# Altium PCB Briac_Charger.PcbDoc (part 2 of 4)
Units mm, origin at the board's own origin, x right, y up, seen from the top; angles counter-clockwise.
Board outline 70.05 x 79.98 mm, 2 copper layers (Top Layer, Bottom Layer), stack 1.448 mm thick; 114 components, 62 nets, 335 pads, 3733 vias.
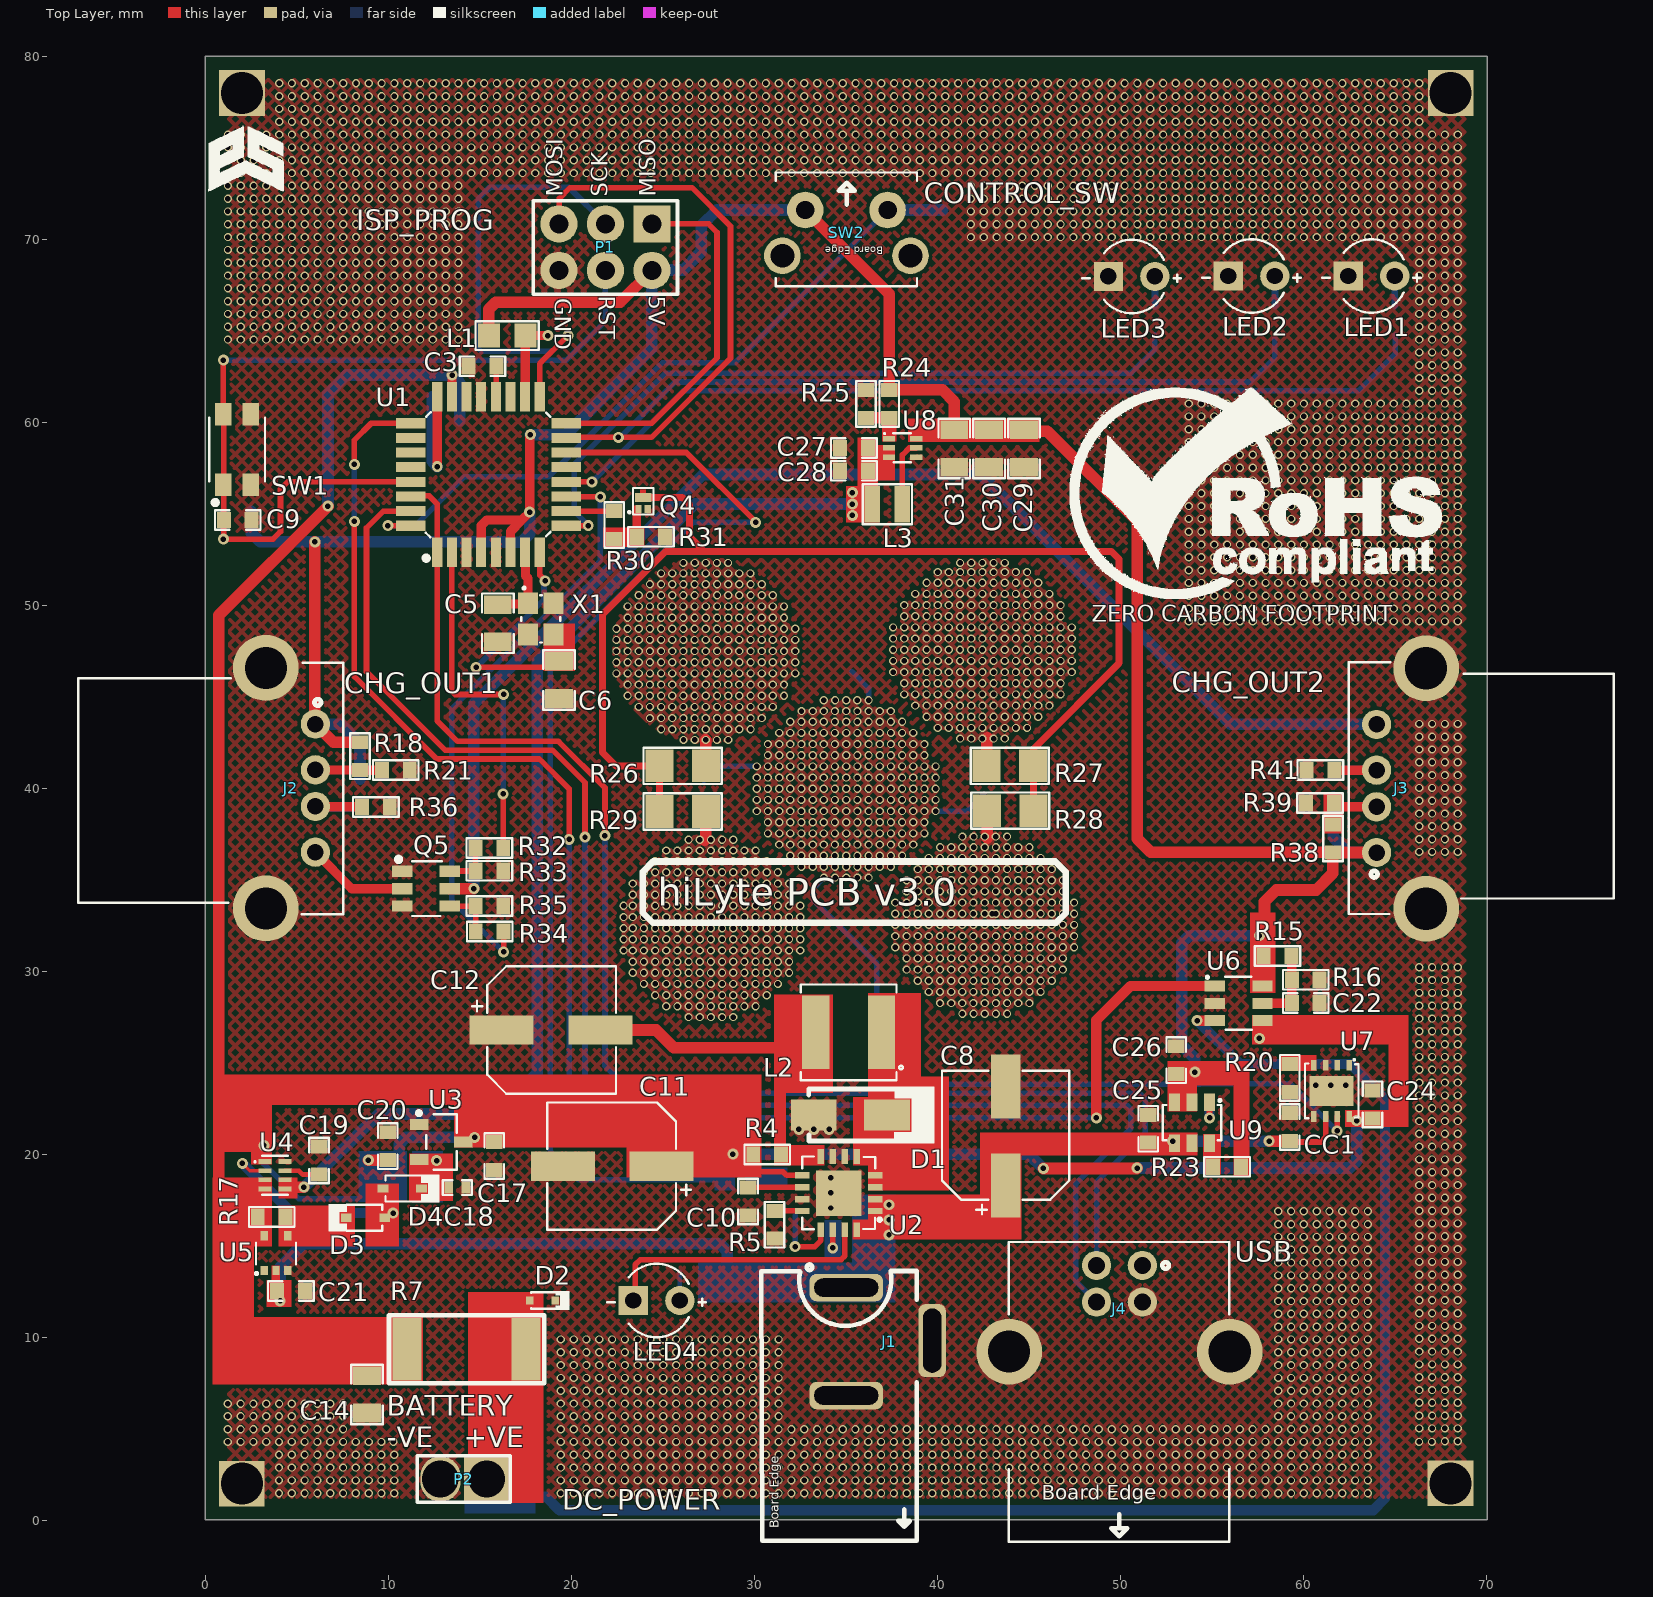
[diagram p0: Top Layer view]

## Part data (continued)
R9: library part AC0603FR-0733KL, "Res Thick Film 0603 33K Ohm 1% 1/10W ±100ppm/°C Molded SMD Paper T/R", Case Code (Imperial)=0603, Case Code (Metric)=1608, MANUFACTURER=Yageo, Max Operating Temperature=155°C, Max Power Dissipation=100mW, Min Operating Temperature=-55°C, Resistance=33kR, Resistor Type="Thick Film", Supplier Part Number 1=YAG3598CT-ND, Temperature Coefficient=100ppm/°C, Tolerance=1%, Voltage Rating=50V, Case/Package=0603, Category="Chip SMD Resistors", ComponentLink1Description=http://components.arrow.com/part/dataview/0323_03349868?src-supplier=Arrow+Europe, ComponentLink1URL=http://components.arrow.com/part/dataview/0323_03349868?src-supplier=Arrow+Europe, ComponentLink2Description=http://www.yageo.com/NewPortal/yageodocoutput?fileName=/pdf/R-Chip/PYu-AC_51_RoHS_L_6.pdf&src-supplier=Arrow+Electronics, ComponentLink2URL=http://www.yageo.com/NewPortal/yageodocoutput?fileName=/pdf/R-Chip/PYu-AC_51_RoHS_L_6.pdf&src-supplier=Arrow+Electronics, ComponentLink3Description=http://www.yageo.com/NewPortal/yageodocoutput?fileName=/pdf/R-Chip/PYu-AC_51_RoHS_L_6.pdf&src-supplier=Digi-Key, ComponentLink3URL=http://www.yageo.com/NewPortal/yageodocoutput?fileName=/pdf/R-Chip/PYu-AC_51_RoHS_L_6.pdf&src-supplier=Digi-Key, ComponentLink4Description=http://www.yageo.com/documents/recent/PYu-AC_51_RoHS_L_2.pdf?src-supplier=Future+Electronics, ComponentLink4URL=http://www.yageo.com/documents/recent/PYu-AC_51_RoHS_L_2.pdf?src-supplier=Future+Electronics, ComponentLink5Description=http://www.yageo.com/NewPortal/yageodocoutput?fileName=/pdf/R-Chip/PYu-AC_51_RoHS_L_6.pdf&src-supplier=Mouser, ComponentLink5URL=http://www.yageo.com/NewPortal/yageodocoutput?fileName=/pdf/R-Chip/PYu-AC_51_RoHS_L_6.pdf&src-supplier=Mouser, ComponentLink6Description=http://www.yageo.com/NewPortal/yageodocoutput?fileName=/pdf/R-Chip/PYu-AC_51_RoHS_L_6.pdf&src-supplier=Rutronik, ComponentLink6URL=http://www.yageo.com/NewPortal/yageodocoutput?fileName=/pdf/R-Chip/PYu-AC_51_RoHS_L_6.pdf&src-supplier=Rutronik, ComponentLink7Description=http://www.yageo.com/NewPortal/yageodocoutput?fileName=/pdf/R-Chip/PYu-AC_51_RoHS_L_6.pdf&src-supplier=Schukat, ComponentLink7URL=http://www.yageo.com/NewPortal/yageodocoutput?fileName=/pdf/R-Chip/PYu-AC_51_RoHS_L_6.pdf&src-supplier=Schukat, ComponentLink8Description=http://www.yageo.com/NewPortal/yageodocoutput?fileName=/pdf/R-Chip/PYu-AC_51_RoHS_L_6.pdf&src-supplier=TTI, ComponentLink8URL=http://www.yageo.com/NewPortal/yageodocoutput?fileName=/pdf/R-Chip/PYu-AC_51_RoHS_L_6.pdf&src-supplier=TTI, Construction=Rectangular, Depth=0.8mm, Features="Moisture Resistant,Automotive AEC-Q200", Height=0.022inch, Lead Free="Lead Free", Length=1.6mm, Manufacturer Part Number=AC0603FR-0733KL, Military Standard=Not, Number of Terminations=2, Packaging="Tape and Reel", Power Rating=100mW, Pricing 1="1=0.10000, 10=0.02900, 100=0.01170, 1000=0.00527, 2500=0.00458 (USD)", RoHS=Yes, RoHS Compliant=Yes, Series=AC, Stock 1=9255, Supplier 1=Digi-Key, Termination=SMD/SMT, Width=0.031inch
R11 R12 R13: library part RC0603FR-073K3L, "RES SMD 3.3K OHM 1% 1/10W 0603", Case/Package=0603, MANUFACTURER="Yageo Phycomp", Max Operating Temperature=155°C, Min Operating Temperature=-55°C, Power Rating=100mW, Resistance=3.3kR, Supplier Part Number 1=311-3.30KHRCT-ND, Temperature Coefficient=100ppm/°C, Tolerance=1%, Voltage Rating (DC)=50V, Depth=0.8mm, Height=0.45mm, Lead Free="Lead Free", Length=1.6mm, Manufacturer Part Number=RC0603FR-073K3L, Mount="Surface Mount", Number of Pins=2, Packaging="Cut Tape", Pricing 1="1=0.1, 10=0.024, 100=0.0097, 1000=0.00437, 2500=0.00379 (USD)", REACH SVHC="No SVHC", Stock 1=6863000, Supplier 1=Digi-Key, Width=800um
R14: library part RC0603JR-07470KL, "RES 470K OHM 5% 1/10W 0603", Case Code (Imperial)=0603, Case Code (Metric)=1608, MANUFACTURER=Yageo, Max Operating Temperature=155°C, Max Power Dissipation=100mW, Min Operating Temperature=-55°C, Package Quantity=1, Resistance=470kR, Resistance Tolerance=5%, Resistor Type="Thick Film", Supplier Part Number 1=311-470KGRCT-ND, Temperature Coefficient=100ppm/°C, Voltage Rating=75V, Voltage Rating (DC)=50V, Case/Package=0603, ComponentLink1Description=https://datasheet.ciiva.com/2452/pyu-r-int-thick-7-2452918.pdf?src-supplier=Digi-Key, ComponentLink1URL=https://datasheet.ciiva.com/2452/pyu-r-int-thick-7-2452918.pdf?src-supplier=Digi-Key, ComponentLink2Description=https://datasheet.ciiva.com/2452/pyu-r-int-thick-7-2452919.pdf?src-supplier=Digi-Key, ComponentLink2URL=https://datasheet.ciiva.com/2452/pyu-r-int-thick-7-2452919.pdf?src-supplier=Digi-Key, ComponentLink3Description=https://datasheet.ciiva.com/7746/443971-7746489.pdf?src-supplier=Element14, ComponentLink3URL=https://datasheet.ciiva.com/7746/443971-7746489.pdf?src-supplier=Element14, ComponentLink4Description=https://datasheet.ciiva.com/7746/443971-7746490.pdf?src-supplier=Element14, ComponentLink4URL=https://datasheet.ciiva.com/7746/443971-7746490.pdf?src-supplier=Element14, ComponentLink5Description=https://datasheet.ciiva.com/46395/443971-46395146.pdf?src-supplier=Element14, ComponentLink5URL=https://datasheet.ciiva.com/46395/443971-46395146.pdf?src-supplier=Element14, ComponentLink6Description=https://datasheet.ciiva.com/15189/getdatasheetpartid-343810-15189869.pdf?src-supplier=Verical, ComponentLink6URL=https://datasheet.ciiva.com/15189/getdatasheetpartid-343810-15189869.pdf?src-supplier=Verical, ComponentLink7Description=http://www.yageo.com/documents/recent/PYu-RC_Group_51_RoHS_L_10.pdf?src-supplier=Digi-Key, ComponentLink7URL=http://www.yageo.com/documents/recent/PYu-RC_Group_51_RoHS_L_10.pdf?src-supplier=Digi-Key, ComponentLink8Description=http://www.yageo.com/documents/recent/PYu-RC_Group_51_RoHS_L_9.pdf?src-supplier=Digi-Key, ComponentLink8URL=http://www.yageo.com/documents/recent/PYu-RC_Group_51_RoHS_L_9.pdf?src-supplier=Digi-Key, ComponentLink9Description=http://www.farnell.com/datasheets/1868787.pdf?src-supplier=Element14, ComponentLink9URL=http://www.farnell.com/datasheets/1868787.pdf?src-supplier=Element14, Construction=Rectangular, Depth=0.8mm, Features="Moisture Resistant", Height=0.022inch, Lead Free="Lead Free", Length=1.6mm, Manufacturer Part Number=RC0603JR-07470KL, Military Standard=Not, Number of Pins=2, Number of Terminations=2, Packaging="Tape and Reel", Power Rating=100mW, Pricing 1="1=0.1, 10=0.02, 100=0.008, 1000=0.0036, 2500=0.0031 (USD)", REACH SVHC="No SVHC", RoHS Compliant=Yes, Series=RC, Size Code=0603, Stock 1=1213798, Supplier 1=Digi-Key, Termination=SMD/SMT, Tolerance=5%, Weight=7.1E-05oz, Width=0.8mm
R18 R21 R22 R36 R38 R39 R40 R41: library part ERJP03F4702V, "RES SMD 47K Ohm 1% 0.2W(1/5W) 0603", Case Code (Imperial)=0603, Case Code (Metric)=1608, MANUFACTURER=Panasonic, Manufacturer Part Number=ERJ-P03F4702V, Max Operating Temperature=155°C, Min Operating Temperature=-55°C, Package Quantity=5000, Power Rating=200mW, Resistance=47kR, Resistor Type="Thick Film", Supplier Part Number 1=P16027CT-ND, Temperature Coefficient=200ppm/°C, Tolerance=1%, Voltage Rating=150V, Case/Package=0603, Category="Chip SMD Resistors", ComponentLink1Description=https://datasheet.ciiva.com/11817/0900766b812cb812-11817157.pdf?src-supplier=RSComponents, ComponentLink1URL=https://datasheet.ciiva.com/11817/0900766b812cb812-11817157.pdf?src-supplier=RSComponents, ComponentLink2Description=https://datasheet.ciiva.com/48537/erjp-series-eng-tds-48537294.pdf?src-supplier=Distrelec, ComponentLink2URL=https://datasheet.ciiva.com/48537/erjp-series-eng-tds-48537294.pdf?src-supplier=Distrelec, ComponentLink3Description=https://datasheet.ciiva.com/6138/1801181-6138332.pdf?src-supplier=Farnell, ComponentLink3URL=https://datasheet.ciiva.com/6138/1801181-6138332.pdf?src-supplier=Farnell, ComponentLink4Description=https://datasheet.ciiva.com/7802/1790600-7802523.pdf?src-supplier=Element14, ComponentLink4URL=https://datasheet.ciiva.com/7802/1790600-7802523.pdf?src-supplier=Element14, ComponentLink5Description=https://datasheet.ciiva.com/7802/1790600-7802522.pdf?src-supplier=Element14, ComponentLink5URL=https://datasheet.ciiva.com/7802/1790600-7802522.pdf?src-supplier=Element14, ComponentLink6Description=https://datasheet.ciiva.com/22730/1790600-22730106.pdf?src-supplier=Element14, ComponentLink6URL=https://datasheet.ciiva.com/22730/1790600-22730106.pdf?src-supplier=Element14, ComponentLink7Description=https://datasheet.ciiva.com/28681/1790600-28681575.pdf?src-supplier=Element14, ComponentLink7URL=https://datasheet.ciiva.com/28681/1790600-28681575.pdf?src-supplier=Element14, ComponentLink8Description=https://datasheet.ciiva.com/24072/aoa0000ce4-64075-24072175.pdf?src-supplier=Mouser, ComponentLink8URL=https://datasheet.ciiva.com/24072/aoa0000ce4-64075-24072175.pdf?src-supplier=Mouser, Contact Plating=Tin, Depth=0.8mm, Height=0.45mm, Length=1.6mm, Military Standard=Not, Mount="Surface Mount", Number of Pins=2, Packaging="Tape and Reel", Pricing 1="1=0.37000, 10=0.31600, 100=0.12360, 1000=0.05175, 2500=0.04744 (USD)", Radiation Hardening=No, REACH SVHC="No SVHC", RoHS=Yes, RoHS Compliant=Yes, Stock 1=5635, Supplier 1=Digi-Key, Termination=SMD/SMT, Voltage Rating (DC)=150V, Width=0.8mm
R20: library part ERJU3RD3300V, "RES SMD 0.5% 100mW 33kO 0603", MANUFACTURER=PANASONIC, Operating Temperature Range=-55?~+155?, Power(Watts)=100mW, Temperature Coefficient=±50ppm/?, Tolerance=±0.5%
R24: library part AC0603FR-07732KL, "RES SMD 732kOhm 1% 0603", Case Code (Imperial)=0603, Case Code (Metric)=1608, MANUFACTURER=Yageo, Max Operating Temperature=155°C, Max Power Dissipation=100mW, Min Operating Temperature=-55°C, Resistance=732kR, Resistor Type="Thick Film", Supplier Part Number 1=603-AC0603FR-07732KL, Temperature Coefficient=100ppm/°C, Tolerance=1%, Voltage Rating=50V, Case/Package=0603, Category="Chip SMD Resistors", ComponentLink1Description=http://www.mouser.com/ds/2/447/yageodocoutput-1111992.pdf?src-supplier=Mouser, ComponentLink1URL=http://www.mouser.com/ds/2/447/yageodocoutput-1111992.pdf?src-supplier=Mouser, ComponentLink2Description=http://www.yageo.com/NewPortal/yageodocoutput?fileName=/pdf/R-Chip/PYu-AC_51_RoHS_L_6.pdf&src-supplier=Digi-Key, ComponentLink2URL=http://www.yageo.com/NewPortal/yageodocoutput?fileName=/pdf/R-Chip/PYu-AC_51_RoHS_L_6.pdf&src-supplier=Digi-Key, Features="Moisture Resistant,Automotive AEC-Q200", Height=0.022inch, Length=0.063inch, Manufacturer Part Number=AC0603FR-07732KL, Number of Terminations=2, Packaging="Tape and Reel", Power Rating=100mW, Pricing 1="1=0.10000, 10=0.02200, 50=0.02200, 100=0.00800, 1000=0.00600, 10000=0.00400 (USD)", RoHS=Yes, RoHS Compliant=Yes, Series=AC, Stock 1=40000, Supplier 1=Mouser, Termination=SMD/SMT, Width=0.031inch
R26 R27 R28 R29: library part ERJ8BWFR100V, "RES SMD 1206 0.1 Ohm 1% 1W ±100ppm/°C", Case Code (Imperial)=1206, Case Code (Metric)=3216, MANUFACTURER=Panasonic, Manufacturer Part Number=ERJ-8BWFR100V, Max Operating Temperature=155°C, Max Power Dissipation=1W, Min Operating Temperature=-55°C, Package Quantity=1, Resistance=100mR, Resistance Tolerance=1%, Resistor Type="Thick Film,Low-Ohm-Resistor", Supplier Part Number 1=P.10AUCT-ND, Temperature Coefficient=100ppm/°C, Case/Package=1206, Category="Chip SMD Resistors", ComponentLink1Description=https://datasheet.ciiva.com/11812/0900766b8126441d-11812516.pdf?src-supplier=RSComponents, ComponentLink1URL=https://datasheet.ciiva.com/11812/0900766b8126441d-11812516.pdf?src-supplier=RSComponents, ComponentLink2Description=https://datasheet.ciiva.com/16212/erj-8bwfr100v-16212037.pdf?src-supplier=Future+Electronics, ComponentLink2URL=https://datasheet.ciiva.com/16212/erj-8bwfr100v-16212037.pdf?src-supplier=Future+Electronics, ComponentLink3Description=https://datasheet.ciiva.com/24072/aoa0000ce3-72189-24072813.pdf?src-supplier=Mouser, ComponentLink3URL=https://datasheet.ciiva.com/24072/aoa0000ce3-72189-24072813.pdf?src-supplier=Mouser, ComponentLink4Description=https://datasheet.ciiva.com/2451/aoa0000ce3-2451533.pdf?src-supplier=Digi-Key, ComponentLink4URL=https://datasheet.ciiva.com/2451/aoa0000ce3-2451533.pdf?src-supplier=Digi-Key, ComponentLink5Description=https://datasheet.ciiva.com/17208/aoa0000ce3-17208060.pdf?src-supplier=Avnet+Europe, ComponentLink5URL=https://datasheet.ciiva.com/17208/aoa0000ce3-17208060.pdf?src-supplier=Avnet+Europe, ComponentLink6Description=https://datasheet.ciiva.com/2451/aoa0000ce3-2451532.pdf?src-supplier=Digi-Key, ComponentLink6URL=https://datasheet.ciiva.com/2451/aoa0000ce3-2451532.pdf?src-supplier=Digi-Key, ComponentLink7Description=https://datasheet.ciiva.com/46386/1662788-46386715.pdf?src-supplier=Element14, ComponentLink7URL=https://datasheet.ciiva.com/46386/1662788-46386715.pdf?src-supplier=Element14, ComponentLink8Description=https://datasheet.ciiva.com/6137/1662788-6137674.pdf?src-supplier=Farnell, ComponentLink8URL=https://datasheet.ciiva.com/6137/1662788-6137674.pdf?src-supplier=Farnell, ComponentLink9Description=https://datasheet.ciiva.com/43455/1662788-43455193.pdf?src-supplier=Farnell, ComponentLink9URL=https://datasheet.ciiva.com/43455/1662788-43455193.pdf?src-supplier=Farnell, ComponentLink10Description=https://datasheet.ciiva.com/16787/70068852-16787433.pdf?src-supplier=Allied+Electronics, ComponentLink10URL=https://datasheet.ciiva.com/16787/70068852-16787433.pdf?src-supplier=Allied+Electronics, ComponentLink11Description=https://datasheet.ciiva.com/28667/39793-28667735.pdf?src-supplier=Element14, ComponentLink11URL=https://datasheet.ciiva.com/28667/39793-28667735.pdf?src-supplier=Element14, ComponentLink12Description=https://datasheet.ciiva.com/48516/erj-eng-tds-48516677.pdf?src-supplier=Distrelec, ComponentLink12URL=https://datasheet.ciiva.com/48516/erj-eng-tds-48516677.pdf?src-supplier=Distrelec, ComponentLink13Description=https://datasheet.ciiva.com/30092/6aoa0000ce3-30092213.pdf?src-supplier=Onlinecomponents.com, ComponentLink13URL=https://datasheet.ciiva.com/30092/6aoa0000ce3-30092213.pdf?src-supplier=Onlinecomponents.com, ComponentLink14Description=https://datasheet.ciiva.com/16783/70068852-16783653.pdf?src-supplier=Allied+Electronics, ComponentLink14URL=https://datasheet.ciiva.com/16783/70068852-16783653.pdf?src-supplier=Allied+Electronics, ComponentLink15Description=https://datasheet.ciiva.com/16780/70068852-16780101.pdf?src-supplier=Allied+Electronics, ComponentLink15URL=https://datasheet.ciiva.com/16780/70068852-16780101.pdf?src-supplier=Allied+Electronics, ComponentLink16Description=https://datasheet.ciiva.com/2451/aoa0000ce3-2451534.pdf?src-supplier=Digi-Key, ComponentLink16URL=https://datasheet.ciiva.com/2451/aoa0000ce3-2451534.pdf?src-supplier=Digi-Key, ComponentLink17Description=https://datasheet.ciiva.com/16516/aoa0000ce3-16516495.pdf?src-supplier=Avnet+Asia, ComponentLink17URL=https://datasheet.ciiva.com/16516/aoa0000ce3-16516495.pdf?src-supplier=Avnet+Asia, Construction=Rectangular, Contact Plating=Tin, Depth=1.6mm, Features="Automotive AEC-Q200", Height=0.65mm, Lead Free="Lead Free", Length=3.2mm, Military Standard=Not, Mount="Surface Mount", Number of Pins=2, Number of Terminations=2, Packaging="Tape and Reel", Power Rating=1W, Pricing 1="1=0.86000, 10=0.63400, 100=0.36940, 1000=0.20719, 2500=0.20002 (USD)", Radiation Hardening=No, REACH SVHC="No SVHC", RoHS=Yes, RoHS Compliant=Yes, Series=ERJ, Size Code=1206, Stock 1=71395, Supplier 1=Digi-Key, Technology="THICK FILM", Termination=SMD/SMT, Tolerance=1%, Width=0.063inch
SW1: "3mm 2mm Round Button 50mA Top3.65mm SPST 12V SMD Tactile Switches", MANUFACTURER=XKB, Package=Custom, ComponentLink1Description=LCSC, ComponentLink1URL=https://lcsc.com/product-detail/Tactile-Switches_XKB-Connectivity-TS-1185EC-C-D-B_C318893.html, Manufacturer Part No=TS-1185EC-C-D-B
SW2: "6mm 8.35mm Round Button 50mA 6mm SPST 12V Plugin Tactile Switches", MANUFACTURER=ALPSALPINE, Package=Custom, ComponentLink1Description=LCSC, ComponentLink1URL=https://lcsc.com/product-detail/Tactile-Switches_ALPSALPINE-SKHHLQA010_C125034.html, Manufacturer Part No=SKHHLQA010
U1: "IC MCU 8BIT 32KB FLASH 32TQFP", Case/Package=A, Frequency=20MHz, MANUFACTURER="Microchip / Atmel", Max Operating Temperature=85°C, Max Supply Voltage=5.5V, Min Operating Temperature=-40°C, Min Supply Voltage=1.8V, Package Quantity=250, Supplier Part Number 1=25AC6140, Category=Microcontrollers, ComponentLink1Description=https://datasheet.ciiva.com/1166/doc8161-1166860.pdf?src-supplier=Newark, ComponentLink1URL=https://datasheet.ciiva.com/1166/doc8161-1166860.pdf?src-supplier=Newark, ComponentLink2Description=https://datasheet.ciiva.com/29119/155196-da-01-en-microcontr-atmega328p-au-8bit-tqfp-32-29119594.pdf?src-supplier=Conrad, ComponentLink2URL=https://datasheet.ciiva.com/29119/155196-da-01-en-microcontr-atmega328p-au-8bit-tqfp-32-29119594.pdf?src-supplier=Conrad, ComponentLink3Description=https://datasheet.ciiva.com/1157/1693866-1157693.pdf?src-supplier=Element14, ComponentLink3URL=https://datasheet.ciiva.com/1157/1693866-1157693.pdf?src-supplier=Element14, ComponentLink4Description=https://datasheet.ciiva.com/15213/getdatasheetpartid-365828-15213131.pdf?src-supplier=Verical, ComponentLink4URL=https://datasheet.ciiva.com/15213/getdatasheetpartid-365828-15213131.pdf?src-supplier=Verical, Core Architecture=AVR, Data Bus Width=8b, Height=1mm, Interface=I2C,SPI,USART, Lead Free="Lead Free", Length=7mm, Manufacturer Part Number=ATMEGA328P-AU, Max Frequency=20MHz, Memory Size=32KB, Memory Type=FLASH, Mount="Surface Mount", Number of ADC Channels=8, Number of I2C Channels=1, Number of I/Os=23, Number of Pins=32, Number of Programmable I/O=23, Number of PWM Channels=6, Number of SPI Channels=1, Number of Timers/Counters=3, Oscillator Type=Internal, Packaging=Tray, Peripherals="Brown-out Detect/Reset,POR,PWM,WDT", Radiation Hardening=No, RAM Size=2KB, REACH SVHC="No SVHC", RoHS=Yes, RoHS Compliant=Yes, Series=ATmega328P, Supplier 1=Newark, Watchdog Timer=Yes, Weight=0.002469oz, Width=7mm
U2: "QFN-16_4x4x065P Battery Management ICs ROHS", MANUFACTURER=TOPPOWER, Package="16 QFN 4x4", ComponentLink1Description=LCSC, ComponentLink1URL=https://lcsc.com/product-detail/Battery-Management-ICs_TOPPOWER-Nanjing-Extension-Microelectronics-TP5000-QFN16_C51699.html, Manufacturer Part No=TP5000_QFN16
U3: "IC DETECTOR VOLT 2.9V OD SSOP3", Case/Package=SSOP, MANUFACTURER=Rohm, Max Operating Temperature=105°C, Max Reset Threshold Voltage=2.929V, Max Supply Voltage=6V, Min Operating Temperature=-40°C, Min Reset Threshold Voltage=2.871V, Min Supply Voltage=2.3V, Number of Voltages Monitored=1, Operating Supply Current=900nA, Supplier Part Number 1=755-BD48K29G-TL, Threshold Voltage=2.9V, Accuracy=1%, Category="Voltage Supervisors", ComponentLink1Description=https://datasheet.ciiva.com/15105/getdatasheetpartid-705726-15105774.pdf?src-supplier=Verical, ComponentLink1URL=https://datasheet.ciiva.com/15105/getdatasheetpartid-705726-15105774.pdf?src-supplier=Verical, ComponentLink2Description=https://datasheet.ciiva.com/6598/bd48xxg-e-6598662.pdf?src-supplier=Digi-Key, ComponentLink2URL=https://datasheet.ciiva.com/6598/bd48xxg-e-6598662.pdf?src-supplier=Digi-Key, Lead Free="Lead Free", Manufacturer Part Number=BD48K29G-TL, Mount="Surface Mount", Number of Monitored Inputs=1, Number of Pins=3, Package Quantity=1, Packaging="Tape and Reel", Pricing 1="1=0.48000, 10=0.39100, 50=0.39100, 100=0.24100, 500=0.20000, 1000=0.15000, 3000=0.13600, 10000=0.13600 (USD)", Radiation Hardening=No, Reset="Active Low", RoHS=Yes, RoHS Compliant=Yes, Series=BD48xxx, Stock 1=2854, Supplier 1=Mouser, Type="Simple Reset/Power-On Reset,Voltage Detector"
U4: "IC PWR SWITCH N-CHAN 1:1 8TDFN", MANUFACTURER="Dialog Semiconductor", Max Operating Temperature=70°C, Max Output Current=4A, Min Operating Temperature=-20°C, Supplier Part Number 1=1827-1124-1-ND, ComponentLink1Description=https://datasheet.ciiva.com/3231/lmr62014-3231410.pdf?src-supplier=Avnet, ComponentLink1URL=https://datasheet.ciiva.com/3231/lmr62014-3231410.pdf?src-supplier=Avnet, ComponentLink2Description=https://datasheet.ciiva.com/23854/1777788-23854326.pdf?src-supplier=Newark, ComponentLink2URL=https://datasheet.ciiva.com/23854/1777788-23854326.pdf?src-supplier=Newark, ComponentLink3Description=https://datasheet.ciiva.com/4879/snvs735a-74121-4879731.pdf?src-supplier=Mouser, ComponentLink3URL=https://datasheet.ciiva.com/4879/snvs735a-74121-4879731.pdf?src-supplier=Mouser, ComponentLink4Description=https://datasheet.ciiva.com/22669/1716576-22669414.pdf?src-supplier=Element14, ComponentLink4URL=https://datasheet.ciiva.com/22669/1716576-22669414.pdf?src-supplier=Element14, ComponentLink5Description=https://datasheet.ciiva.com/6603/lmr62014-6603804.pdf?src-supplier=Digi-Key, ComponentLink5URL=https://datasheet.ciiva.com/6603/lmr62014-6603804.pdf?src-supplier=Digi-Key, ComponentLink6Description=https://datasheet.ciiva.com/6603/lmr62014-6603807.pdf?src-supplier=Digi-Key, ComponentLink6URL=https://datasheet.ciiva.com/6603/lmr62014-6603807.pdf?src-supplier=Digi-Key, ComponentLink7Description=https://www.verical.com/server-webapp/html/getDatasheet?partID=705722&src-supplier=Verical, ComponentLink7URL=https://www.verical.com/server-webapp/html/getDatasheet?partID=705722&src-supplier=Verical, ComponentLink8Description=http://rohmfs.rohm.com/en/techdata_basic/ic/package/ssop3_1-e.pdf?src-supplier=Digi-Key, ComponentLink8URL=http://rohmfs.rohm.com/en/techdata_basic/ic/package/ssop3_1-e.pdf?src-supplier=Digi-Key, ComponentLink9Description=http://rohmfs.rohm.com/en/products/databook/datasheet/ic/power/voltage_detector/bd48xxg-e.pdf?src-supplier=Digi-Key, ComponentLink9URL=http://rohmfs.rohm.com/en/products/databook/datasheet/ic/power/voltage_detector/bd48xxg-e.pdf?src-supplier=Digi-Key, Manufacturer Part Number=SLG7NT402V, Number of Outputs=1, Number of Pins=8, Output Configuration="High Side", Packaging="Cut Tape", Pricing 1="1=0.67, 10=0.591, 25=0.5548, 100=0.4529, 250=0.4206, 500=0.358, 1000=0.2864 (USD)", Stock 1=74575, Supplier 1=Digi-Key
U5: "IC INVERTER OD 1CH 1-INP SC70-5", Case/Package=SC, Low Level Output Current=32mA, MANUFACTURER="ON Semiconductor / Fairchild", Max Operating Temperature=85°C, Max Supply Voltage=5.5V, Min Operating Temperature=-40°C, Min Supply Voltage=1.65V, Package Quantity=1, Quiescent Current=2uA, Supplier Part Number 1=NC7SZ05P5XCT-ND, Category="Amplifiers - Op Amps, Buffer, Instrumentation", ComponentLink1Description=https://datasheet.ciiva.com/3231/lmr62014-3231410.pdf?src-supplier=Avnet, ComponentLink1URL=https://datasheet.ciiva.com/3231/lmr62014-3231410.pdf?src-supplier=Avnet, ComponentLink2Description=https://datasheet.ciiva.com/23854/1777788-23854326.pdf?src-supplier=Newark, ComponentLink2URL=https://datasheet.ciiva.com/23854/1777788-23854326.pdf?src-supplier=Newark, ComponentLink3Description=https://datasheet.ciiva.com/4879/snvs735a-74121-4879731.pdf?src-supplier=Mouser, ComponentLink3URL=https://datasheet.ciiva.com/4879/snvs735a-74121-4879731.pdf?src-supplier=Mouser, ComponentLink4Description=https://datasheet.ciiva.com/22669/1716576-22669414.pdf?src-supplier=Element14, ComponentLink4URL=https://datasheet.ciiva.com/22669/1716576-22669414.pdf?src-supplier=Element14, ComponentLink5Description=https://datasheet.ciiva.com/6603/lmr62014-6603804.pdf?src-supplier=Digi-Key, ComponentLink5URL=https://datasheet.ciiva.com/6603/lmr62014-6603804.pdf?src-supplier=Digi-Key, ComponentLink6Description=https://datasheet.ciiva.com/6603/lmr62014-6603807.pdf?src-supplier=Digi-Key, ComponentLink6URL=https://datasheet.ciiva.com/6603/lmr62014-6603807.pdf?src-supplier=Digi-Key, ComponentLink7Description=https://datasheet.ciiva.com/5701/678459-5701517.pdf?src-supplier=Farnell, ComponentLink7URL=https://datasheet.ciiva.com/5701/678459-5701517.pdf?src-supplier=Farnell, ComponentLink8Description=https://datasheet.ciiva.com/26097/nc7sz05-26097353.pdf?src-supplier=Avnet+Europe, ComponentLink8URL=https://datasheet.ciiva.com/26097/nc7sz05-26097353.pdf?src-supplier=Avnet+Europe, ComponentLink9Description=https://datasheet.ciiva.com/46415/678459-46415099.pdf?src-supplier=Element14, ComponentLink9URL=https://datasheet.ciiva.com/46415/678459-46415099.pdf?src-supplier=Element14, ComponentLink10Description=https://datasheet.ciiva.com/16783/nc7sz05-16783085.pdf?src-supplier=Future+Electronics, ComponentLink10URL=https://datasheet.ciiva.com/16783/nc7sz05-16783085.pdf?src-supplier=Future+Electronics, ComponentLink11Description=https://datasheet.ciiva.com/1861/nc7sz05-1861934.pdf?src-supplier=Digi-Key, ComponentLink11URL=https://datasheet.ciiva.com/1861/nc7sz05-1861934.pdf?src-supplier=Digi-Key, ComponentLink12Description=https://datasheet.ciiva.com/7970/678459-7970639.pdf?src-supplier=Element14, ComponentLink12URL=https://datasheet.ciiva.com/7970/678459-7970639.pdf?src-supplier=Element14, ComponentLink13Description=https://datasheet.ciiva.com/1861/nc7sz05-1861932.pdf?src-supplier=Digi-Key, ComponentLink13URL=https://datasheet.ciiva.com/1861/nc7sz05-1861932.pdf?src-supplier=Digi-Key, ComponentLink14Description=https://datasheet.ciiva.com/5701/nc7sz05-5701516.pdf?src-supplier=Farnell, ComponentLink14URL=https://datasheet.ciiva.com/5701/nc7sz05-5701516.pdf?src-supplier=Farnell, ComponentLink15Description=https://datasheet.ciiva.com/1861/nc7sz05-1861933.pdf?src-supplier=Digi-Key, ComponentLink15URL=https://datasheet.ciiva.com/1861/nc7sz05-1861933.pdf?src-supplier=Digi-Key, Height=1mm, Input Type=SINGLE-ENDED, Lead Free="Lead Free", Length=2mm, Logic Function=Buffer,Inverter, Manufacturer Part Number=NC7SZ05P5X, Max Output Current=32mA, Mount="Surface Mount", Number of Channels=1, Number of Circuits=1, Number of Elements=1, Number of Functions=1, Number of Gates=1, Number of Inputs=1, Number of Outputs=1, Number of Pins=5, Number of Terminals/Pins=5, Output Current=32mA, Packaging="Tape and Reel", Polarity=Inverting, Pricing 1="1=0.41000, 10=0.30800, 25=0.26920, 100=0.17430, 250=0.14428, 500=0.11544, 1000=0.08850 (USD)", Propagation Delay=13.4ns, Radiation Hardening=No, REACH SVHC="No SVHC", RoHS=Yes, RoHS Compliant=Yes, Schmitt Trigger Input=No, Series=7SZ, Stock 1=165573, Supplier 1=Digi-Key, Supply Voltage-Nom=5.5V, Technology=CMOS, Termination=SMD/SMT, Turn-On Delay Time=4.3ns, Weight=23g, Width=1.25mm
U6: "26V, bi-directional, 350kHz current sense amplifier 6-SOT-23 -40 to 125", Case/Package=SOT-23-6, Drain to Source Voltage (Vdss)=60V, Input Capacitance=4.84nF, MANUFACTURER="Texas Instruments", Max Operating Temperature=125°C, Max Power Dissipation=12W, Min Operating Temperature=-40°C, Operating Supply Current=260uA, Supplier Part Number 1=296-47658-1-ND, -3db Bandwidth=350kHz, Category="Amplifiers - Op Amps, Buffer, Instrumentation", ComponentLink1Description=http://www.ti.com/lit/ds/symlink/ina181.pdf?src-supplier=Digi-Key, ComponentLink1URL=http://www.ti.com/lit/ds/symlink/ina181.pdf?src-supplier=Digi-Key, FET Type="2 N-Channel", Manufacturer Part Number=INA181A3IDBVR, Mount="Surface Mount", Number of Circuits=1, Number of Pins=22, Packaging="Cut Tape", Pricing 1="1=0.51000, 10=0.43700, 25=0.40800, 100=0.32650, 250=0.30316, 500=0.25652, 1000=0.19822 (USD)", Rds On Max=2.1mR, RoHS=Yes, RoHS Compliant=Yes, Slew Rate=2V/µs, Stock 1=3258, Supplier 1=Digi-Key
U7: "Autoswitching Power Mux 8-SON -40 to 85", Case/Package=VSON, Current - Output 2=1.25A, MANUFACTURER="Texas Instruments", Max Input Voltage=5.5V, Max Operating Temperature=85°C, Min Input Voltage=2.8V, Min Operating Temperature=-40°C, Package Quantity=250, Supplier Part Number 1=TPS2115ADRBTG4-ND, Category="Integrated Circuits (ICs)", ComponentLink1Description=https://datasheet.ciiva.com/15109/getdatasheetpartid-681241-15109323.pdf?src-supplier=Verical, ComponentLink1URL=https://datasheet.ciiva.com/15109/getdatasheetpartid-681241-15109323.pdf?src-supplier=Verical, ComponentLink2Description=https://datasheet.ciiva.com/3232/tps2115a-3232539.pdf?src-supplier=Avnet, ComponentLink2URL=https://datasheet.ciiva.com/3232/tps2115a-3232539.pdf?src-supplier=Avnet, ComponentLink3Description=https://datasheet.ciiva.com/1961/tps2115a-1961014.pdf?src-supplier=Digi-Key, ComponentLink3URL=https://datasheet.ciiva.com/1961/tps2115a-1961014.pdf?src-supplier=Digi-Key, Lead Free="Lead Free", Manufacturer Part Number=TPS2115ADRBTG4, Max Output Current=1.25A, Number of Inputs=2, Number of Outputs=1, Number of Pins=8, Operating Supply Voltage=5.5V, Output Current=1.25A, Packaging="Tape and Reel", Pricing 1="500=1.58974 (USD)", Radiation Hardening=No, RoHS=Yes, RoHS Compliant=Yes, Series=-, Supplier 1=Digi-Key, Turn-On Delay Time=1ms, Weight=0.000847oz
U8: "3.7-A boost converter with 0.5-V ultra-low input voltage 6-SOT-5X3 -40 to 125", MANUFACTURER="Texas Instruments", Supplier Part Number 1=296-TPS61023DRLRDKR-ND, Category="Voltage Regulators - Switching", Manufacturer Part Number=TPS61023DRLR, Pricing 1="1=1.03000, 10=0.91900, 25=0.87240, 100=0.71680, 250=0.67004, 500=0.59212, 1000=0.51450 (USD)", RoHS=Yes, Supplier 1=Digi-Key
U9: "IC PWR DRIVER P-CHAN 1:1 6TSOP", MANUFACTURER=onsemi, Package=Custom, ComponentLink1Description="New link", ComponentLink1URL=https://www.digikey.co.uk/en/products/detail/onsemi/NTGD1100LT1G/1484846, Manufacturer Part No=NTGD1100LT1G
X1: "16MHz SMD Crystal Resonator 10pF 80O ±10ppm", Equivalent Series Resistance (ESR)=80O, Frequency=16MHz, Frequency Tolerance=±10ppm, Load Capacitance=10pF, MANUFACTURER="Seiko Epson", Operating Temperature=-40?~+85?, Crystal Type="SMD Crystal"

## Free pads (board coordinates)
  rect 2.5x2.5 hole 2.3: MH1(2.007,78.001) MH2(68.054,77.993) MH3(68.047,2.022) MH4(1.999,2.007)

## Via types
v1: diameter 0.45, hole 0.3, Top Layer to Bottom Layer, 2562 vias
v2: diameter 0.45, hole 0.3, Top Layer to Bottom Layer, tented both sides, 1106 vias
v3: diameter 0.6, hole 0.3, Top Layer to Bottom Layer, tented both sides, 65 vias

## Nets (pads, with @x,y where several pads share a name; then routed paths per layer and width w, separated by ;. In a path a pad name is that pad's centre, name@x,y a point inside that pad or via, vN(x,y) a via of type N, cw(c..) or ccw(c..) an arc to the next point about the centre after c; other vN are vias at no path point)
#5V: D3.2 R17.1 U5.4
#CS: Q1.3 U2.13 | length 3.8
  Top Layer w0.305: v3(32.233,14.961) 33.314,14.961 33.645,15.292 U2.13@33.645,15.882
  Bottom Layer w0.305: v3(32.233,14.961) Q1.3@32.233,16.637
#S1: R37.2 U9.1 | length 1.7
  Top Layer w0.305: U9.1@54.868,22.855 54.879,22.844 54.879,22.007 v3(54.889,21.996)
  Bottom Layer w0.305: R37.2@54.873,22.849 R37.2@54.881,22.841 ; v3@54.881,22.005 v3(54.889,21.996)
  Bottom Layer w0.559: v3@54.881,22.005 R37.2@54.881,22.841
#VS: C12.2 L2.2 R4.1 U2.8 | length 11.6
  Top Layer w0.508: L2.2@33.227,26.797 L2.2@33.354,26.67
  Top Layer w0.635: C12.2@21.59,26.797 24.638,26.797 24.866,26.569 25.603,25.832 32.563,25.832
A1: C15.1 R8.1 R9.1 U1.24 | length 7.7
  Top Layer w0.508: v3(12.679,57.582) U1.24@12.679,61.4
  Bottom Layer w0.635: C15.1@12.395,61.392 R8.1@12.395,58.852 12.395,57.865 v3(12.679,57.582)
ADC_A2: U1.25 U6.1 | length 89.5
  Top Layer w0.305: v3(8.153,54.585) 8.153,46.101 12.649,41.605 18.263,41.605 19.888,39.98 v3(19.888,37.211) ; v3(8.153,57.709) 8.153,59.03 9.074,59.95 U1.25@11.229,59.95
  Top Layer w0.559: v3(48.692,21.996) 48.692,27.33 50.567,29.205 U6.1@55.164,29.205
  Bottom Layer w0.305: v3(8.153,54.585) v3(8.153,57.709) ; v3(19.888,37.211) 19.888,22.937 20.829,21.996 v3(48.692,21.996)
AVCC: C4.2 L1.2 U1.18 | length 6
  Top Layer w0.508: U1.18@17.479,61.4 17.487,61.408 17.487,64.736 L1.2@17.495,64.744 ; L1.2@17.495,64.744 v3(18.72,64.745)
  Bottom Layer w0.508: C4.2@17.257,64.744 v3(18.72,64.745)
BOOST_FB: R24.1 R25.1 U8.1 | length 1.3
  Top Layer w0.635: R25.1@36.103,60.249 R24.1@37.373,60.249
CHRG: LED4.1 U2.15 | length 15.1
  Top Layer w0.305: LED4.1@23.393,12.014 23.495,12.116 23.495,13.97 23.774,14.249 34.747,14.249 34.945,14.447 U2.15@34.945,15.882
CHRG_5V: C7.1 C8.1 C21.1 C25.1 CC1.1 J1.1 R2.2 R3.2 U2.1 U2.2 U2.16 U5.2 U7.6 U9.4 U9.5 | length 37.3
  Top Layer w0.254: U2.16@35.595,15.882 U2.16@35.631,15.918
  Top Layer w0.305: CC1.1@59.258,20.726 59.309,20.676 60.96,20.676 61.219,20.935 U7.6@61.219,22.07
  Top Layer w0.635: v3(58.141,20.726) CC1.1@59.258,20.726
  Bottom Layer w0.635: v3(4.089,11.999) 4.089,13.843 5.359,15.113 28.118,15.113 28.524,14.707 28.524,14.072 ; v3(52.857,20.726) v3(58.141,20.726)
  other v3: 37.363,15.596 37.363,16.421 37.363,17.247
D11/MOSI: P1.5 R12.2 U1.15 | length 68.8
  Top Layer w0.305: P1.5@19.329,70.841 19.355,70.866 19.355,72.238 19.939,72.822 26.594,72.822 28.702,70.714 28.702,63.5 24.384,59.182 v3(22.581,59.182) 19.761,59.182 U1.15@19.729,59.15
  Bottom Layer w0.305: v3(22.581,59.182) 22.657,59.182 25.679,62.205 57.099,62.205 58.445,63.551 R12.2@58.445,64.795
D12/MISO: P1.1 U1.16 | length 20.3
  Top Layer w0.305: U1.16@19.729,59.95 24.39,59.95 27.965,63.525 27.965,70.383 27.508,70.841 P1.1@24.409,70.841
D13/SCK: P1.3 U1.17 | length 25.5
  Top Layer w0.305: U1.17@18.279,61.4 18.279,63.211 v3(19.812,64.745)
  Bottom Layer w0.305: v3(19.812,64.745) 18.948,63.881 15.088,63.881 14.91,64.06 14.91,72.212 15.545,72.847 19.863,72.847 P1.3@21.869,70.841
DM1: J2.2 R18.1 R21.2 | length 3.6
  Top Layer w0.508: J2.2@6.02,41.012 6.028,41.004 8.45,41.004 R18.1@8.458,40.996 R21.2@9.652,40.996
DM2: J3.2 R38.1 R39.2 | length 2.5
  Top Layer w0.508: 61.849,38.583 61.849,38.892 61.951,38.993 J3.2@64.008,38.993
DP1: J2.3 R22.1 R36.2 | length 5.1
  Top Layer w0.508: J2.3@6.02,39.012 6.031,39.001 8.548,39.001 R36.2@8.56,38.989
  Bottom Layer w0.508: J2.3@6.02,39.012 6.057,38.975 8.232,38.975 8.345,38.862 R22.1@8.458,38.862
DP2: J3.3 R40.1 R41.2 | length 4.7
  Top Layer w0.508: R41.2@61.697,41.021 61.723,40.994 J3.3@64.008,40.993 J3.3@64.008,40.993
  Bottom Layer w0.508: R40.1@61.646,41.021 61.66,41.007 63.994,41.007 J3.3@64.008,40.993